# Altium PCB IoT-Button-PCB-v1.3.PcbDoc (part 2 of 2)
Units mil, origin at the board's own origin, x right, y up, seen from the top; angles counter-clockwise.
Board outline 3543.3 x 3267.72 mil, 2 copper layers (Top Layer, Bottom Layer), stack 61.811 mil thick; 61 components, 28 nets, 224 pads, 60 vias.
Unrouted connection lines stored in the file: 71.
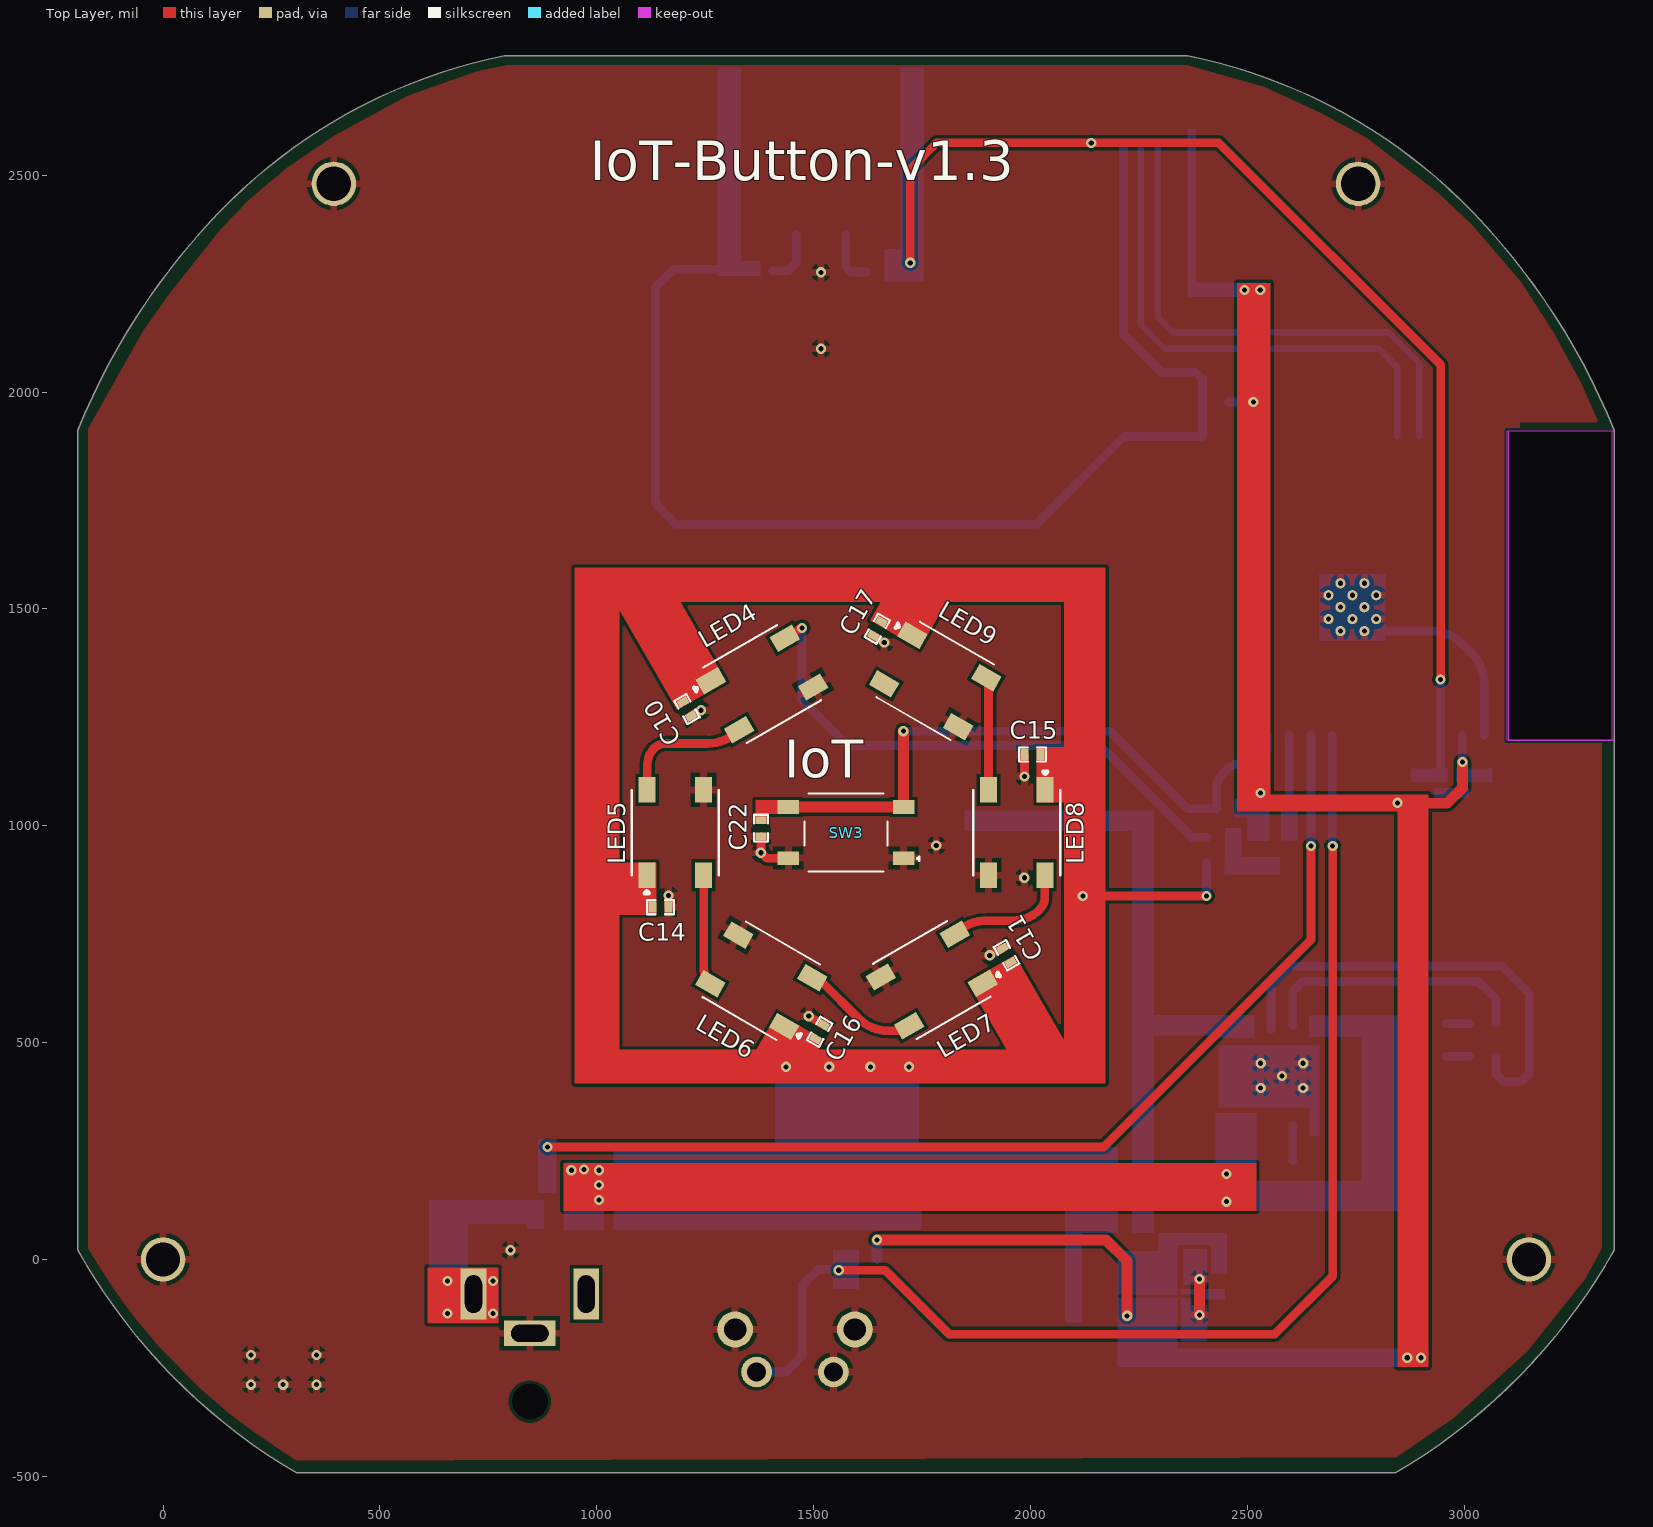
[diagram p0: Top Layer view]

## Other copper (continued)
Bottom Layer: (continued)
  region net GND: 2371.11,-88.74 2346.56,-88.74 2346.56,-189.5 2371.11,-189.5
  rectangle net 3.3V: 2201.45,-248 2334.61,-89.33
  rectangle net VIN: 2326.36,-81.46 2339.28,23.84
  rectangle net GND: 2666,1426 2819,1581
  rectangle net BATT: 2235,516 2463,564
  rectangle net BATT: 2234,60.51 2285,1035
  rectangle net BATT: 2432.5,511 2516.76,564
  region net NetQ1_3: 2575.27,887 2575.27,928.13 2448,928.13 2448,887
  rectangle net NetQ1_3: 2448.35,891 2487.35,995
  rectangle net DIN: 2577.47,966.25 2616.47,1057.28
  rectangle net 3.3V: 2470.47,1019.25 2551.72,1062.25
  rectangle net 5VDC: 2427.35,111.25 2914,180.25
  region net EN: 2961.73,1132.19 2876.64,1132.19 2876.64,1100.81 2961.73,1100.81
  rectangle net 3.3V: 2980.92,1100.63 3066,1132
  rectangle net GND: 2931,1064 3011,1087
  rectangle net 5VDC: 2433.35,112.25 2516.76,333.62
  rectangle net GND: 2643.14,284.92 2666.76,470.3
  rectangle net GND: 2433.35,349.62 2666.76,493.58
  rectangle net 5VDC: 2427,112 2521,337
  region net EN: 1699.99,2747.62 1699.99,2276 1754.28,2276 1754.28,2747.62
  rectangle net 3.3V: 2500.47,964.25 2551.72,1092.32
  rectangle net BUTTON: 1545,-68 1605,21.5
  region net IO0: 1377.36,2302 1284.17,2302 1284.17,2267.5 1377.36,2267.5
  region net IO0: 1278.88,2747.91 1278.88,2267.5 1333.18,2267.5 1333.18,2747.91
  rectangle net 5VIN: 613.35,-149 773,-18.75
  rectangle net 5VDC: 2763.95,113.25 2913.95,562.18
  rectangle net BATT: 1847.91,988.11 2260,1035
  rectangle net 3.3V: 2362.53,2219.59 2547,2252.58
  rectangle net 3.3V: 2362.53,2219.59 2382.22,2606.04
  rectangle net EN: 1663.3,2255 1754,2330.3
  rectangle net 5VDC: 2642,513 2913.95,562.18
  rectangle net 5VCC: 1410.95,202.25 1742.95,482
  rectangle net VIN: 2201.45,-80.79 2295.36,18.99
  rectangle net 3.3V: 2326.36,-248 2339.28,-88.74
  rectangle net 3.3V: 2314.5,-248.31 2918,-206
  rectangle net VIN: 2203.97,-80.79 2295.36,18.99
  rectangle net VIN: 2201.45,-18.23 2325.36,17.99
  rectangle net VIN: 2201.45,-80.87 2334.61,19.84
  rectangle net 5VCC: 1264.95,169 2202.28,259.25
  rectangle net 5VCC: 1038.75,67.63 1748.77,259.25
  rectangle net 5VCC: 2079.95,60.51 2201.89,259.25
  rectangle net 5VCC: 2079.95,-145.75 2119,161.64
  region net JACK_DET: 907,152.5 907,277 864,277 864,152.5
  rectangle net 5VDC: 923.14,67.63 1017,223
  rectangle net 5VIN: 621.35,81.25 878.49,137.14
  rectangle net 5VIN: 839.12,70.21 878.49,137.14
  rectangle net 5VIN: 613.35,-126.48 703.01,137.14
  rectangle net 5VIN: 621.35,-126.48 739.46,-47.74

## Silkscreen, mask and mechanical layers (free items; w line width, h text height)
Top Overlay:
  text "IoT-Button-v1.3" at 984.25,2458.89 h157.48
  text "IoT" at 1432.6,1082.03 h150
Bottom Overlay:
  drawing of 3085 lines, arcs and shapes, not listed
  text "SERIAL PROGRAMMING" at 2665.49,2365.44 h100
  text "ZERO CARBON FOOTPRINT" at 1040.45,1837.25 h38
  text "RESET" at 1567.68,1733 h150 r270
  text "BOOT" at 1299.18,1732.49 h150 r270
  text "Place Battery Here" at 1467,587 h150
  text "CHARGING" at 3297.91,582.17 h100
  text "FULLY CHARGED" at 3297.56,260.76 h100
  text "POWER" at 1015.54,-489.24 h150 r270
  text "INPUT" at 1681.49,-489.24 h150 r270
Deimensions:
  circle w10: c1574.8,984.25 r393.7
  lines w10: 1397.64,-492.13 1515.75,-492.13 ; 1397.64,-489.13 1397.64,-410.39 1515.75,-410.39 1515.75,-489.13 ; 722.96,-414 959.18,-414 959.18,-253.72 722.96,-253.72 722.96,-414 ; 772.17,-488.8 909.97,-488.8 909.97,-414 772.17,-414 772.17,-488.8 ; 1330.71,-410.39 1330.71,-288.34 1566.93,-288.34 1566.93,-410.39 1330.71,-410.39 ; 1456.69,866.14 1456.69,1102.36 1692.91,1102.36 1692.91,866.14 1456.69,866.14 ; 1515.75,984.25 cw(c1574.8,984.25) 1633.86,984.25 cw(c1574.8,984.25) 1515.75,984.25
Board Outline:
  lines w10: 1397.64,-492.13 1515.75,-492.13 ; 3100,1196.56 3100,1910.74 3346.45,1911.17 ccw(c1885.82,1322.48) 3021.65,2413.3 ccw(c2112.99,1540.64) 2362.2,2775.59 787.4,2775.59 ccw(c1036.62,1540.64) 127.96,2413.3 ccw(c1263.78,1322.48) -196.85,1911.17 -196.85,21.41 ccw(c1004.42,696.47) 307.28,-492.13 2842.32,-492.13 ccw(c2145.19,696.47) 3346.46,21.41 3346.45,1197.26 3100,1196.81 ; -39.37,0 cw(c0,0) 39.37,0 cw(c0,0) -39.37,0 ; 354.33,2480.32 ccw(c393.7,2480.32) 433.07,2480.32 ccw(c393.7,2480.32) 354.33,2480.32 ; 2716.54,2480.32 ccw(c2755.91,2480.32) 2795.28,2480.32 ccw(c2755.91,2480.32) 2716.54,2480.32 ; 3110.24,0 cw(c3149.61,0) 3188.98,0 cw(c3149.61,0) 3110.24,0
Fabrication:
  drawing of 191 lines, arcs and shapes, not listed
  text "Layer" at 4078.09,1206 h60
  text "Name" at 4488,1206 h60
  text "Material" at 5417.74,1206 h60
  text "Thickness" at 6277.51,1206 h60
  text "Constant" at 6927.35,1206 h60
  text "Board Layer Stack" at 7497.21,1206 h60
  text "Top Overlay" at 4488,1086 h60
  text "Top Solder" at 4488,966 h60
  text "Solder Resist" at 5417.74,966 h60
  text "0.39mil" at 6277.51,966 h60
  text "3.5" at 6927.35,966 h60
  text "1" at 4078.09,846 h60
  text "Top Layer" at 4488,846 h60
  text "1.38mil" at 6277.51,846 h60
  text "Dielectric 1" at 4488,726 h60
  text "FR-4" at 5417.74,726 h60
  text "59.06mil" at 6277.51,726 h60
  text "4.8" at 6927.35,726 h60
  text "2" at 4078.09,606 h60
  text "Bottom Layer" at 4488,606 h60
  text "1.38mil" at 6277.51,606 h60
  text "Bottom Solder" at 4488,486 h60
  text "Solder Resist" at 5417.74,486 h60
  text "0.39mil" at 6277.51,486 h60
  text "3.5" at 6927.35,486 h60
  text "Bottom Overlay" at 4488,366 h60
  text "Total board thickness:" at 4078.09,246 h60
  text "62.60mil" at 6277.51,246 h60
Drill Drawing:
  circle w10: c4123.25,2230.33 r33.33
  lines w10: 4089.92,1897 4089.92,1913.67 4106.58,1930.33 4089.92,1947 4089.92,1963.67 4106.58,1963.67 4123.25,1947 4139.92,1963.67 4156.58,1963.67 4156.58,1947 4139.92,1930.33 4156.58,1913.67 4156.58,1897 4139.92,1897 4123.25,1913.67 4106.58,1897 4089.92,1897 ; 4089.92,2063.67 4106.58,2063.67 4123.25,2047 4139.92,2063.67 4156.58,2063.67 4139.92,2080.33 4156.58,2097 4139.92,2097 4123.25,2113.67 4106.58,2097 4089.92,2097 4106.58,2080.33 4089.92,2063.67 ; 4089.92,2413.67 4156.58,2413.67 4123.25,2347 4089.92,2413.67 ; 4089.92,2513.67 4106.58,2513.67 4106.58,2497 4139.92,2497 4139.92,2513.67 4156.58,2513.67 4156.58,2547 4139.92,2547 4139.92,2563.67 4106.58,2563.67 4106.58,2547 4089.92,2547 4089.92,2513.67 ; 4089.92,2647 4123.25,2663.67 4156.58,2647 4139.92,2680.33 4156.58,2713.67 4123.25,2697 4089.92,2713.67 4106.58,2680.33 4089.92,2647
  lines w15: 4030.12,1852 11150.19,1852 ; 4030.12,2752 11150.19,2752 ; 4581,1702 4581,2902 ; 5120.86,1702 5120.86,2902 ; 6220.54,1702 6220.54,2902 ; 6726.42,1702 6726.42,2902 ; 7460.22,1702 7460.22,2902 ; 8959.77,1702 8959.77,2902 ; 9549.62,1702 9549.62,2902 ; 10295.42,1702 10295.42,2902 ; 4030.12,1702 11150.19,1702 11150.19,2902 4030.12,2902 4030.12,1702
  text "Symbol" at 4120.12,2797 h72
  text "Count" at 4626,2797 h72
  text "Hole Size" at 5165.86,2797 h72
  text "Plated" at 6265.54,2797 h72
  text "Hole Type" at 6771.42,2797 h72
  text "Drill Layer Pair" at 7505.22,2797 h72
  text "Via/Pad" at 9004.77,2797 h72
  text "Pad Shape" at 9594.62,2797 h72
  text "Template" at 10340.42,2797 h72
  text "72" at 4626,2647 h60
  text "11.81mil (0.300mm)" at 5165.86,2647 h60
  text "PTH" at 6265.54,2647 h60
  text "Round" at 6771.42,2647 h60
  text "Top Layer - Bottom Layer" at 7505.22,2647 h60
  text "(Mixed)" at 9004.77,2647 h60
  text "Rounded" at 9594.62,2647 h60
  text "(Mixed)" at 10340.42,2647 h60
  text "3" at 4626,2497 h60
  text "39.37mil (1.000mm)" at 5165.86,2497 h60
  text "PTH" at 6265.54,2497 h60
  text "Slot" at 6771.42,2497 h60
  text "Top Layer - Bottom Layer" at 7505.22,2497 h60
  text "Pad" at 9004.77,2497 h60
  text "Rectangle" at 9594.62,2497 h60
  text "(Mixed)" at 10340.42,2497 h60
  text "2" at 4626,2347 h60
  text "43.31mil (1.100mm)" at 5165.86,2347 h60
  text "PTH" at 6265.54,2347 h60
  text "Round" at 6771.42,2347 h60
  text "Top Layer - Bottom Layer" at 7505.22,2347 h60
  text "Pad" at 9004.77,2347 h60
  text "Rounded" at 9594.62,2347 h60
  text "c180h110" at 10340.42,2347 h60
  text "2" at 4626,2197 h60
  text "51.18mil (1.300mm)" at 5165.86,2197 h60
  text "PTH" at 6265.54,2197 h60
  text "Round" at 6771.42,2197 h60
  text "Top Layer - Bottom Layer" at 7505.22,2197 h60
  text "Pad" at 9004.77,2197 h60
  text "Rounded" at 9594.62,2197 h60
  text "c210h130" at 10340.42,2197 h60
  text "4" at 4626,2047 h60
  text "78.74mil (2.000mm)" at 5165.86,2047 h60
  text "PTH" at 6265.54,2047 h60
  text "Round" at 6771.42,2047 h60
  text "Top Layer - Bottom Layer" at 7505.22,2047 h60
  text "Pad" at 9004.77,2047 h60
  text "Rounded" at 9594.62,2047 h60
  text "c260h200m265" at 10340.42,2047 h60
  text "1" at 4626,1897 h60
  text "82.68mil (2.100mm)" at 5165.86,1897 h60
  text "NPTH" at 6265.54,1897 h60
  text "Round" at 6771.42,1897 h60
  text "Top Layer - Bottom Layer" at 7505.22,1897 h60
  text "Pad" at 9004.77,1897 h60
  text "Rounded" at 9594.62,1897 h60
  text "c0hn210m5" at 10340.42,1897 h60
  text "84 Total" at 4626,1747 h60
  text "Slot definitions :" at 4120.12,1602.03 h60
  text "Routed Path Length" at 5152.81,1602.03 h60
  text "= Calculated from tool start centre position to tool end centre position." at 6255.48,1602.03 h60
  text "Hole Length" at 5152.81,1502.05 h60
  text "= Routed Path Length + Tool Size = Slot length as defined in the PCB layout" at 5845.61,1502.05 h60

## Dimensions
2368,2784 to 2842.32,-492.13 on Deimensions
3346.46,21.41 to 3346.46,1911.17 on Deimensions
3346.46,21.41 to -196.85,21.41 on Deimensions
287,-494 to 2842.32,-492.13 on Deimensions
216.95,1638.62 to 216.95,260.25 on Bottom Overlay
216.95,1638.62 to 1594.9,1638.62 on Bottom Overlay

## Text inside footprints (layer, text, board x,y; h text height)
SW4: Bottom Overlay "PCB Edge" at 1541.2,-344.34 h39.37